# Altium PCB PCB.PcbDoc (part 3 of 8)
Units mm, origin at the board's own origin, x right, y up, seen from the top; angles counter-clockwise.
Board outline 78.8 x 69 mm, 12 copper layers (Top Layer, GND_12, uStrip1, GND_35, Clocks, GND_57, POWER, Slow_Ctrl, GND_810, uStrip2, GND_1012, Bottom Layer), stack 2.926 mm thick; 460 components, 314 nets, 1929 pads, 3409 vias.
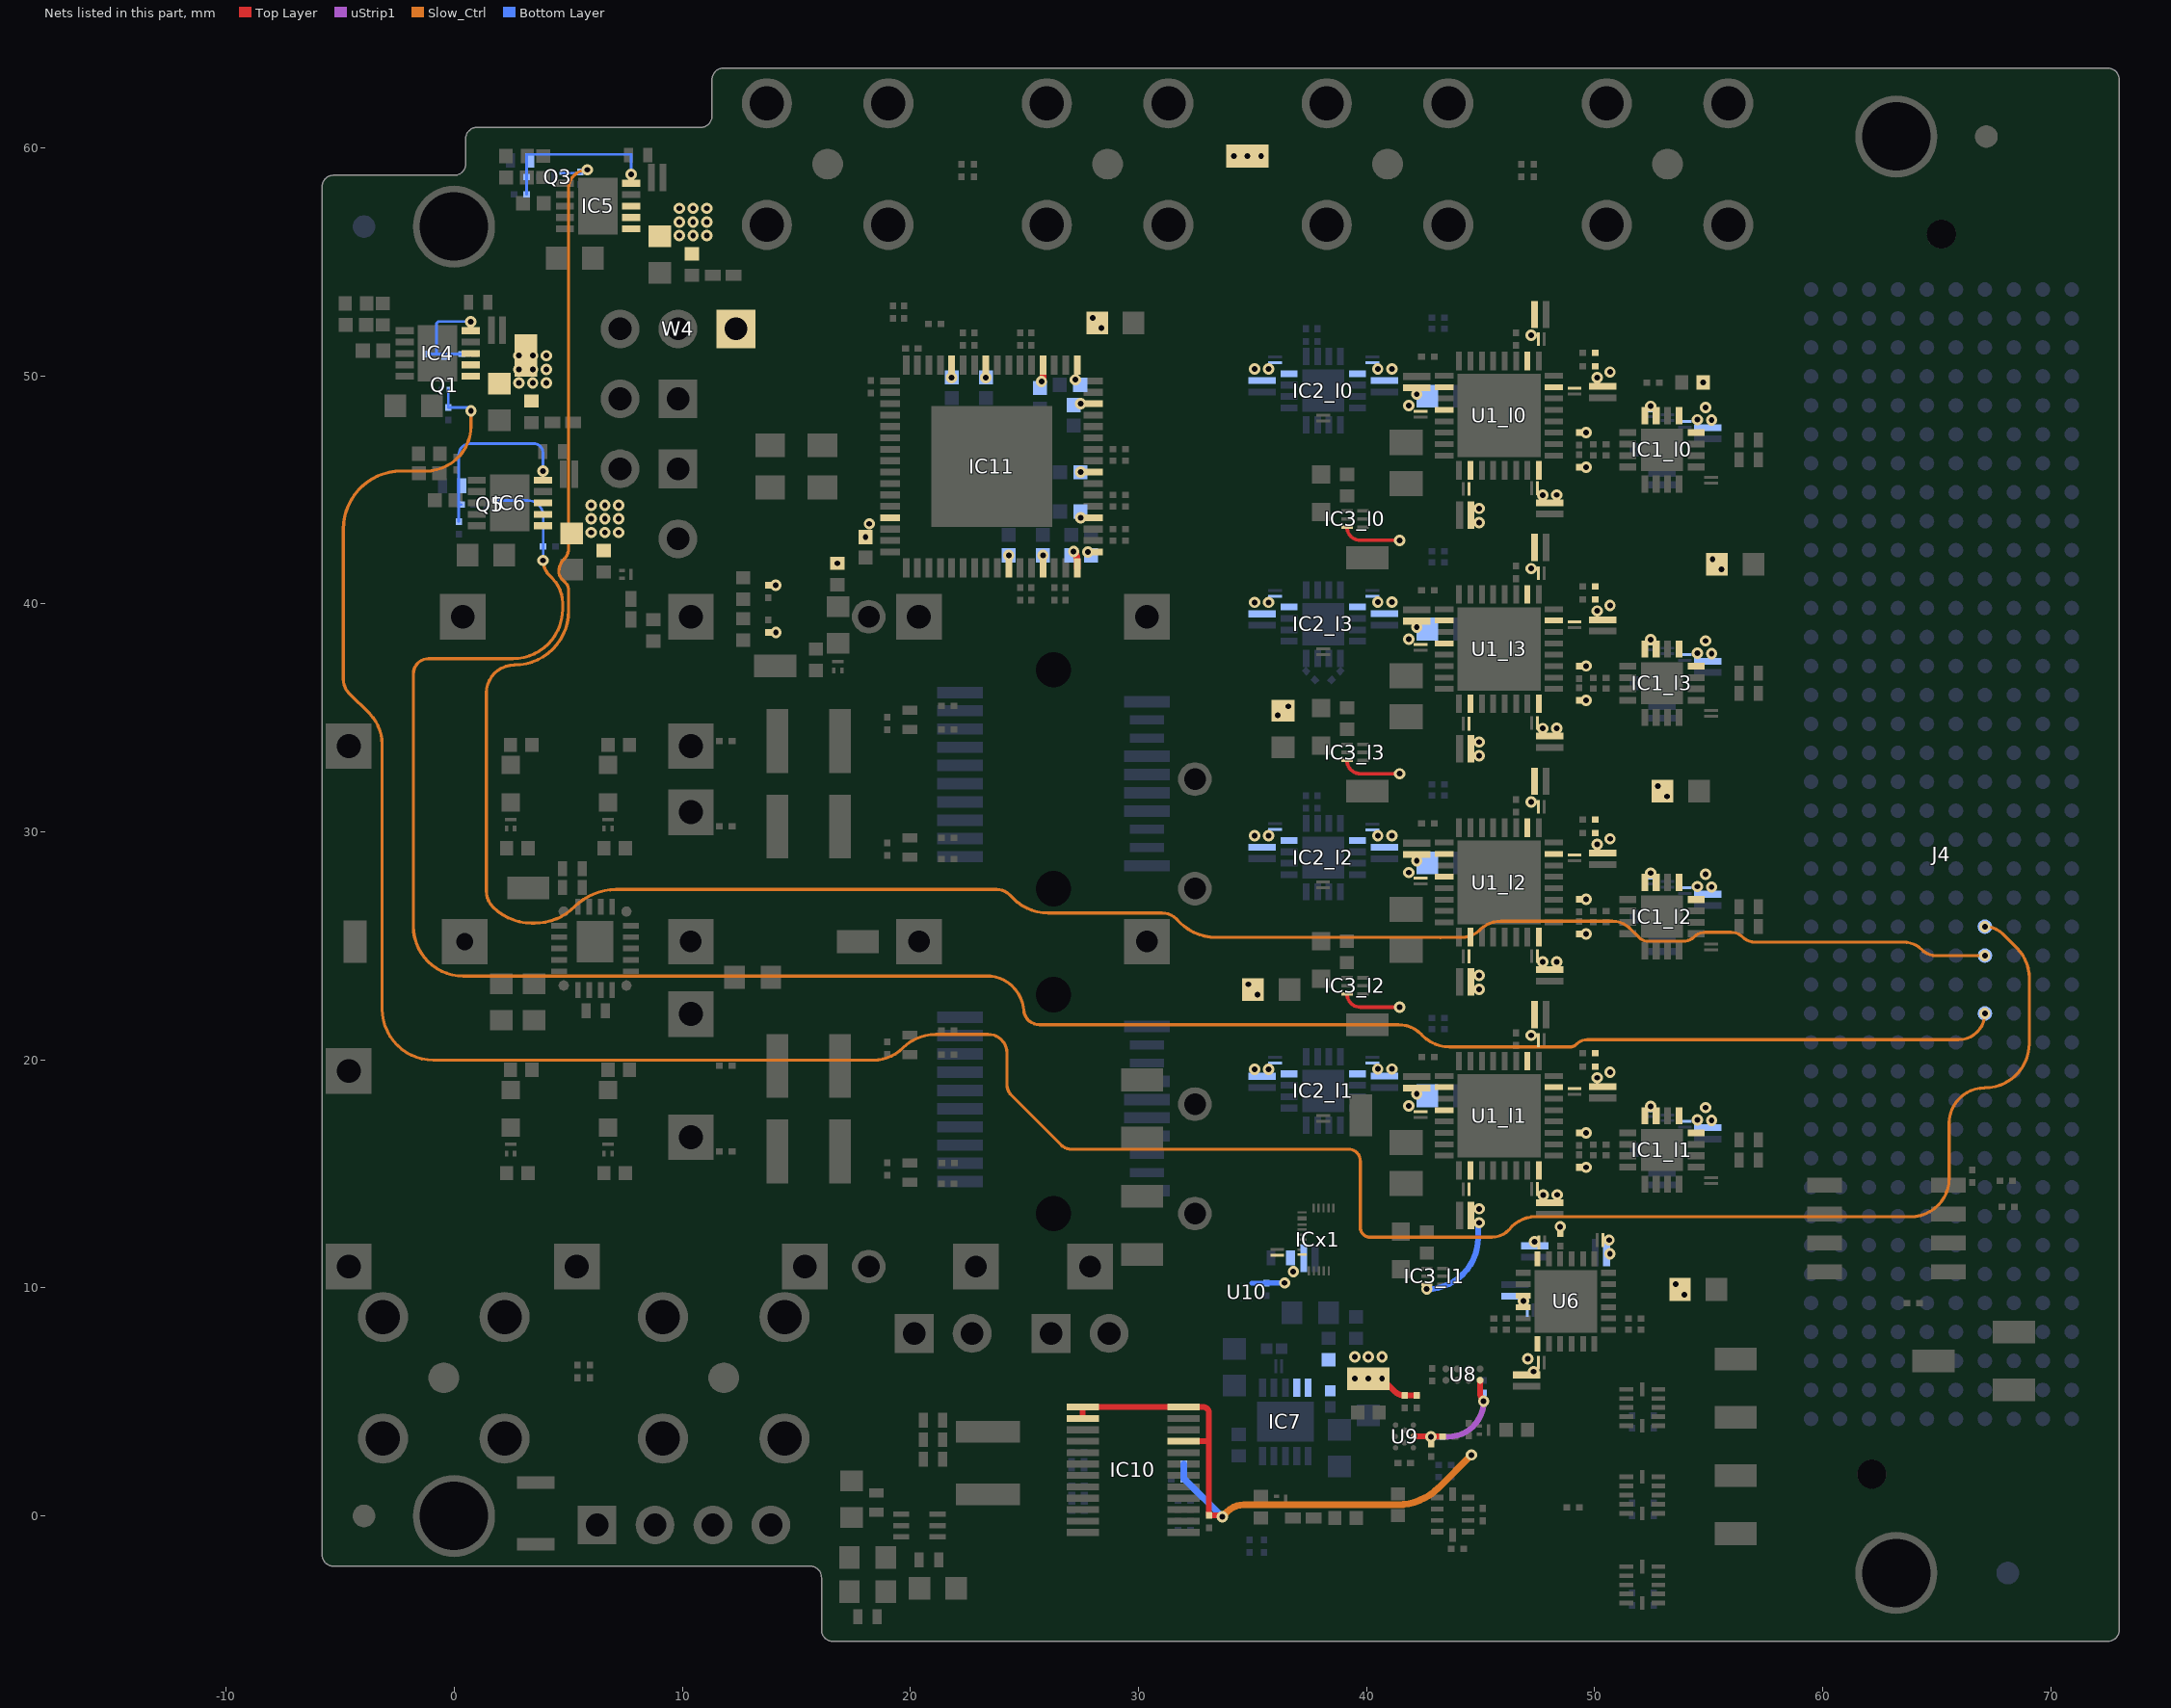
[diagram p12: the nets of this part, all layers, seen from the top]

## Part data (continued)
W1 W2 W5 W6: library part SAMTEC_HTSW-102-23-L-S, "2 Mini Wire-Wrap Contact Strip Header", Manufacturer=SAMTEC, Manufacturer Part Number=HTSW-102-23-L-S, Author="CERN DEM JLC", Component Type=Standard, ComponentHeight=8.38mm, CreateDate=2/22/2018, Family="Header 2", HelpURL=\\cern.ch\dfs\Applications\Altium\Datasheets\SAMTEC_HTSW-102-23-L-S.pdf, LatestRevisionDate=2/22/2018, Mounted=Yes, Part Description="2 Contacts, Pitch 2.54mm, Single Row  Through Mount Straight Header (Post Lead 5.84mm, Tail Lead 2.92mm, Insulator 2.54mm)", Part Number=SAMTEC_HTSW-102-23-L-S, Pin Count=2, PressFit=No, Sense=No, SMD=No, Socket=No, Status=Preferred, Status Comment="High Temperature"
W3: library part SAMTEC_HTSW-104-23-L-S, "4 Mini Wire-Wrap Contact Strip Header", Manufacturer=SAMTEC, Manufacturer Part Number=HTSW-104-23-L-S, Author="CERN DEM JLC", Component Type=Standard, ComponentHeight=8.38mm, CreateDate=2/22/2018, Family="Header 4", HelpURL=\\cern.ch\dfs\Applications\Altium\Datasheets\SAMTEC_HTSW-104-23-L-S.pdf, LatestRevisionDate=2/22/2018, Mounted=Yes, Part Description="4 Contacts, Pitch 2.54mm, Single Row  Through Mount Straight Header (Post Lead 5.84mm, Tail Lead 2.92mm, Insulator 2.54mm)", Part Number=SAMTEC_HTSW-104-23-L-S, Pin Count=4, PressFit=No, Sense=No, SMD=No, Socket=No, Status=Preferred, Status Comment="High Temperature"
W4: library part SAMTEC_HTSW-103-23-L-S, "3 Mini Wire-Wrap Contact Strip Header", Manufacturer=SAMTEC, Manufacturer Part Number=HTSW-103-23-L-S, Author="CERN DEM JLC", Component Type=Standard, ComponentHeight=8.38mm, CreateDate=2/22/2018, Family="Header 3", HelpURL=\\cern.ch\dfs\Applications\Altium\Datasheets\SAMTEC_HTSW-103-23-L-S.pdf, LatestRevisionDate=2/22/2018, Mounted=Yes, Part Description="3 Contacts, Pitch 2.54mm, Single Row Through Mount Straight Header (Post Lead 5.84mm, Tail Lead 2.92mm, Insulator 2.54mm)", Part Number=SAMTEC_HTSW-103-23-L-S, Pin Count=3, PressFit=No, Sense=No, SMD=No, Socket=No, Status=Preferred, Status Comment="High Temperature"
W7: library part SAMTEC_HTSW-101-23-L-S, "Single Mini Wire-Wrap Contact", Manufacturer=SAMTEC, Manufacturer Part Number=HTSW-101-23-L-S, Author="CERN DEM JLC", Component Type=Standard, ComponentHeight=8.38mm, CreateDate=2/22/2018, Family="Header 1", HelpURL=\\cern.ch\dfs\Applications\Altium\Datasheets\SAMTEC_HTSW-101-23-L-S.pdf, LatestRevisionDate=2/22/2018, Mounted=Yes, Part Description="Single Contact Through Mount Straight Header (Post Lead 5.84mm, Tail Lead 2.92mm, Insulator 2.54mm)", Part Number=SAMTEC_HTSW-101-23-L-S, Pin Count=1, PressFit=No, Sense=No, SMD=No, Socket=No, Status=Preferred, Status Comment="High Temperature"

## Free pads (board coordinates)
  round 3.6 hole 3: frame-holes(-0.015,0) frame-holes(-0.015,56.551) frame-holes(63.226,-2.499) frame-holes(63.228,60.499)

## Via types
v1: diameter 0.25, hole 0.1, Top Layer to uStrip1, tented both sides, 1130 vias
v2: diameter 0.25, hole 0.1, uStrip2 to Bottom Layer, tented both sides, 686 vias
v3: diameter 0.5, hole 0.25, Top Layer to Bottom Layer, tented both sides, 674 vias
v4: diameter 0.5, hole 0.25, Top Layer to Bottom Layer, 632 vias
v5: diameter 0.5, hole 0.25, uStrip1 to uStrip2, tented both sides, 281 vias
v6: diameter 0.584, hole 0.483, Top Layer to Bottom Layer, tented both sides, 6 vias

## Nets (pads, with @x,y where several pads share a name; then routed paths per layer and width w, separated by ;. In a path a pad name is that pad's centre, name@x,y a point inside that pad or via, vN(x,y) a via of type N, cw(c..) or ccw(c..) an arc to the next point about the centre after c; other vN are vias at no path point)
1V8: C2_l0.2 C2_l1.2 C2_l2.2 C2_l3.2 C3_l0.2 C3_l1.2 C3_l2.2 C3_l3.2 C4_l0.2 C4_l1.2 C4_l2.2 C4_l3.2 C5_l0.2 C5_l1.2 C5_l2.2 C5_l3.2 C19_l0.2 C19_l1.2 C19_l2.2 C19_l3.2 C20_l0.2 C20_l1.2 C20_l2.2 C20_l3.2 C21_l0.2 C21_l1.2 C21_l2.2 C21_l3.2 C22_l0.2 C22_l1.2 C22_l2.2 C22_l3.2 C57.2 C90.2 C116.2 C117.2 C118.2 C121.2 C122.2 C123.2 C124.2 C125.2 C126.2 C127.2 C128.2 C129.2 C130.2 IC1_l0.12 IC1_l0.13 IC1_l0.15 IC1_l0.16 IC1_l1.12 IC1_l1.13 IC1_l1.15 IC1_l1.16 IC1_l2.12 IC1_l2.13 IC1_l2.15 IC1_l2.16 IC1_l3.12 IC1_l3.13 IC1_l3.15 IC1_l3.16 IC2_l0.8 IC2_l0.13 IC2_l1.8 IC2_l1.13 IC2_l2.8 IC2_l2.13 IC2_l3.8 IC2_l3.13 IC6.1 IC6.2 IC6.3 IC10.1 IC10.2 IC10.21 IC10.24 IC11.26 IC11.29 IC11.32 IC11.33 IC11.36 IC11.40 IC11.46 IC11.49 IC11.52 IC11.57 IC11.60 R24.1 R25.2 R60.2 R61.2 R68.2 R69.2 W4.1 | length 28.7
  Top Layer w0.254: IC10.2@27.554,4.277 IC10.1@27.554,4.777 IC10.24@31.978,4.777 32.835,4.777 cw(c32.835,4.518) 33.093,4.518 33.093,3.277 ; IC10.21@31.978,3.277 33.093,3.277 ; v4(33.671,-0.037) ccw(c33.514,-0.194) 33.514,0.028 C90.2@33.093,0.028 33.093,3.277
  Top Layer w0.3: v3@25.808,49.834 IC11.52@25.808,50.48 ; v3(27.156,42.303) cw(c26.787,41.934) 27.308,41.934 IC11.32@27.308,41.58
  Slow_Ctrl w0.3: v4(33.671,-0.037) 33.92,0.213 cw(c34.597,-0.463) 34.597,0.493 41.358,0.493 ccw(c41.358,3.033) 43.154,1.237 v4(44.595,2.678)
  Bottom Layer w0.3: R61.2@31.978,2.29 R60.2@31.978,1.611 cw(c31.978,1.502) 32.055,1.579 v4(33.671,-0.037)
  other v3: 54.51,17.371 52.449,17.963 35.088,19.595 35.71,19.596 40.49,19.604 41.111,19.603 54.51,27.607 52.449,28.199 35.088,29.832 35.71,29.832 40.49,29.84 41.111,29.839 54.51,37.844 52.449,38.436 14.101,38.748 35.088,40.068 35.71,40.069 40.49,40.076 41.111,40.076 14.099,40.818 24.308,42.13 25.808,42.13 27.78,42.279 27.458,43.78 27.458,45.78 54.51,48.08 52.449,48.672 27.458,48.78 54.758,49.712 25.745,49.756 27.232,49.834 21.808,49.93 23.308,49.93 35.088,50.305 35.71,50.305 40.49,50.313 41.111,50.312
  other v4: 53.94,9.707 53.547,10.165 55.128,17.352 54.868,17.91 35.21,22.862 34.818,23.321 55.128,27.588 54.868,28.146 53.164,31.557 52.772,32.015 36.109,35.115 36.567,35.507 55.128,37.824 54.868,38.382 55.563,41.512 55.17,41.97 6.002,43.133 6.602,43.133 7.202,43.133 6.002,43.733 6.602,43.733 7.202,43.733 6.002,44.333 6.602,44.333 7.202,44.333 55.128,48.061 54.868,48.619 28.379,52.096 27.987,52.554
1V8_DIS: J4.D26 Q5.1 R40.2 | length 98.4
  Slow_Ctrl w0.137: v3(3.896,41.908) ccw(c4.819,41.908) 4.166,41.254 4.301,41.12 cw(c3.216,40.034) 4.75,40.034 4.75,39.782 cw(c2.568,39.782) 2.568,37.6 -1.131,37.6 ccw(c-1.131,36.936) -1.794,36.936 -1.794,25.864 ccw(c0.392,25.864) 0.392,23.677 23.489,23.677 cw(c23.489,23.54) 23.5,23.677 cw(c23.353,22.069) 24.949,22.311 24.967,22.198 ccw(c25.647,22.23) 25.647,21.549 41.392,21.549 cw(c41.392,20.151) 42.381,21.14 42.461,21.059 ccw(c43.635,22.233) 43.635,20.573 48.919,20.573 ccw(c48.919,20.981) 49.208,20.692 cw(c49.678,20.222) 49.678,20.887 65.954,20.887 ccw(c65.954,22.04) v3(67.108,22.04)
  Bottom Layer w0.117: Q5.1@1.754,44.539 3.22,44.539 cw(c3.22,43.863) 3.896,43.863 R40.2@3.896,42.519 v3(3.896,41.908)
1V8_EN: C68.1 IC6.5 R36.1 R37.2 | length 8.1
  Bottom Layer w0.117: R36.1@0.197,43.604 R37.2@0.197,44.364 ; R37.2@0.307,44.364 R37.2@0.197,44.364 ; v3(3.884,45.827) 3.884,46.643 ccw(c3.494,46.643) 3.494,47.033 0.693,47.033 ccw(c0.693,46.536) 0.197,46.536 R37.2@0.197,44.364
1VPSF: C64.2 C65.2 C131.2 C132.2 C133.2 C145.1 C149.1 C151.2 IC7.9 IC7.10 ICx1.19 R34.2 R79.2 R81.1 R82.1 TP7.1 U8.8 U9.2 U10.5 | length 8.7
  Top Layer w0.254: TP7.1@40.674,6.022 41.233,5.463 ccw(c41.661,5.892) R81.1@41.661,5.286 R82.1@42.209,5.286 ; U9.2@42.063,3.49 v3@42.817,3.49 ; v3(42.827,3.475) 42.827,3.49 R79.2@43.322,3.49 ; U8.8@44.975,5.953 44.975,5.417 ccw(c45.513,5.417) v3(45.132,5.037)
  uStrip1 w0.254: v3(42.827,3.475) 43.57,3.475 ccw(c43.57,5.037) v3(45.132,5.037)
  Bottom Layer w0.127: U10.5@34.977,10.211 U10.5@34.977,10.214
  Bottom Layer w0.229: U10.5@34.977,10.211 C151.2@35.616,10.211 ; C151.2@35.603,10.221 v3(36.408,10.221)
  Bottom Layer w0.254: v3(45.132,5.037) v3@45.141,5.037
  other v3: 36.788,10.723
  other v4: 39.477,6.022 40.077,6.022 40.677,6.022 39.477,6.978 40.077,6.978 40.677,6.978
3V3_APLL_DIS: J4.D23 Q1.1 R10.2 | length 124.4
  Slow_Ctrl w0.137: v3(0.73,48.464) 0.73,47.812 cw(c-1.254,47.812) -1.254,45.828 -2.325,45.828 ccw(c-2.325,43.288) -4.865,43.288 -4.865,36.698 ccw(c-3.987,36.698) -4.608,36.078 -3.714,35.184 cw(c-5.047,33.851) -3.162,33.851 -3.162,22.233 ccw(c-0.923,22.233) -0.923,19.994 18.378,19.994 ccw(c18.378,21.82) 19.669,20.529 cw(c21.11,19.087) 21.11,21.126 23.408,21.126 cw(c23.408,20.299) 24.235,20.299 24.235,19.176 24.235,18.907 ; 24.235,18.906 ccw(c24.883,18.907) 24.425,18.449 26.6,16.274 ccw(c27.055,16.73) 27.055,16.086 39.209,16.086 cw(c39.209,15.57) 39.725,15.57 39.725,12.654 ccw(c40.151,12.654) 40.151,12.227 45.49,12.227 ccw(c45.49,13.285) 46.238,12.537 cw(c47.398,11.683) 47.398,13.124 63.857,13.124 ccw(c63.857,14.809) 65.543,14.809 65.543,17.221 cw(c67.096,17.221) 67.096,18.774 ccw(c67.096,20.733) 69.055,20.733 69.055,23.612 ccw(c67.226,23.612) 68.519,24.905 67.905,25.52 ccw(c67.108,24.723) v3(67.108,25.85)
  Bottom Layer w0.117: Q1.1@-0.263,49.404 R10.2@-0.263,48.618 0.576,48.618 cw(c0.576,48.464) v3(0.73,48.464)
3V3_CDR_DIS: J4.D24 Q3.1 R32.2 | length 103.5
  Slow_Ctrl w0.137: v3(5.834,59.04) ccw(c5.834,58.218) 5.012,58.218 5.012,42.442 cw(c4.346,42.442) 4.817,41.97 4.806,41.959 ccw(c5.34,41.425) 4.585,41.425 ccw(c5.073,41.425) 4.728,41.08 4.879,40.928 cw(c4.558,40.607) 5.012,40.607 5.012,39.699 cw(c2.634,39.699) 2.634,37.321 ccw(c2.634,36.089) 1.403,36.089 1.403,27.415 ccw(c2.408,27.415) 1.697,26.704 ccw(c3.395,28.402) 3.395,26 3.521,26 ccw(c3.521,28.5) 5.289,26.733 cw(c7.085,24.936) 7.085,27.476 23.79,27.476 cw(c23.79,26.699) 24.34,27.249 24.512,27.077 ccw(c26.031,28.596) 26.031,26.448 31.033,26.448 cw(c31.033,25.568) 31.655,26.19 31.815,26.03 ccw(c33.4,27.615) 33.4,25.374 43.222,25.374 cw(c43.222,25.237) 43.227,25.374 ccw(c43.247,25.793) 43.248,25.373 44.156,25.374 ccw(c44.156,26.551) 44.988,25.718 cw(c45.886,24.821) 45.886,26.09 50.785,26.09 cw(c50.785,25.033) 51.533,25.781 51.931,25.383 ccw(c52.358,25.81) 52.358,25.205 53.891,25.205 ccw(c53.891,25.862) 54.356,25.398 cw(c54.852,24.901) 54.852,25.604 55.974,25.604 cw(c55.974,24.875) 56.489,25.39 ccw(c57.015,25.916) 57.015,25.172 63.531,25.172 cw(c63.531,24.022) 63.841,25.13 cw(c63.531,24.022) 64.344,24.835 ccw(c64.961,25.452) 64.961,24.58 v3(67.108,24.58)
  Bottom Layer w0.117: Q3.1@4.731,58.898 R32.2@5.517,58.898
3V3APLL: C35.2 C115.2 IC4.1 IC4.2 IC4.3 IC11.13 R9.2 R72.2 TP2.1
  other v3: 16.799,41.782 18.033,42.93 18.198,43.515
  other v4: 2.836,49.69 3.436,49.69 4.036,49.69 2.836,50.29 3.436,50.29 4.036,50.29 2.836,50.89 3.436,50.89 4.036,50.89
3V3APLL_EN: C33.2 IC4.5 R7.1 R8.2 | length 4.4
  Bottom Layer w0.117: -1.061,50.961 -0.779,50.961 ; R8.2@-0.438,50.851 R8.2@-0.548,50.961 ; C33.2@0.327,50.961 -0.438,50.961 R8.2@-0.548,50.961 ; v3(0.718,52.383) -0.704,52.383 -0.779,52.309 -0.779,50.961 ; -0.779,50.961 R8.2@-0.548,50.961
3V3CDR: C6_l0.2 C6_l1.2 C6_l2.2 C6_l3.2 C7_l0.2 C7_l1.2 C7_l2.2 C7_l3.2 C8_l0.2 C8_l1.2 C8_l2.2 C8_l3.2 C9_l0.2 C9_l1.2 C9_l2.2 C9_l3.2 C10_l0.2 C10_l1.2 C10_l2.2 C10_l3.2 C14_l0.2 C14_l1.2 C14_l2.2 C14_l3.2 C15_l0.2 C15_l1.2 C15_l2.2 C15_l3.2 C16_l0.2 C16_l1.2 C16_l2.2 C16_l3.2 C17_l0.2 C17_l1.2 C17_l2.2 C17_l3.2 C26_l0.2 C26_l1.2 C26_l2.2 C26_l3.2 C27_l0.2 C27_l1.2 C27_l2.2 C27_l3.2 C47.2 C134.2 C135.2 C136.2 C137.2 C138.2 C139.2 C143.1 C144.1 IC3_l0.6 IC3_l1.6 IC3_l2.6 IC3_l3.6 IC5.1 IC5.2 IC5.3 R1_l0.2 R1_l1.2 R1_l2.2 R1_l3.2 R2_l0.2 R2_l1.2 R2_l2.2 R2_l3.2 R3_l0.2 R3_l1.2 R3_l2.2 R3_l3.2 R4_l0.2 R4_l1.2 R4_l2.2 R4_l3.2 R14.2 R76.1 TP4.1 U1_l0.2 U1_l0.10 U1_l0.12 U1_l0.18 U1_l0.24 U1_l0.31 U1_l1.2 U1_l1.10 U1_l1.12 U1_l1.18 U1_l1.24 U1_l1.31 U1_l2.2 U1_l2.10 U1_l2.12 U1_l2.18 U1_l2.24 U1_l2.31 U1_l3.2 U1_l3.10 U1_l3.12 U1_l3.18 U1_l3.24 U1_l3.31 U6.12 U6.15 U6.16 U6.19 | length 12.2
  Top Layer w0.152: IC3_l2.6@39.14,22.903 ccw(c39.727,22.903) 39.727,22.316 v3(41.449,22.316) ; IC3_l3.6@39.14,33.14 ccw(c39.727,33.14) 39.727,32.553 v3(41.449,32.553) ; IC3_l0.6@39.14,43.376 ccw(c39.727,43.376) 39.727,42.789 v3(41.449,42.789)
  Bottom Layer w0.254: v3(42.64,9.952) ccw(c42.64,12.199) 44.887,12.199 v3@44.887,12.965
  other v3: 47.324,6.335 47.062,6.893 46.873,9.427 50.671,11.503 47.37,12.024 50.631,12.103 48.492,12.69 44.937,12.864 44.937,13.473 47.741,14.08 48.362,14.087 49.627,15.293 49.627,16.807 41.845,17.984 42.198,18.515 50.106,19.221 50.673,19.462 47.211,21.08 44.937,23.1 44.937,23.709 47.717,24.296 48.339,24.303 49.627,25.529 49.627,27.044 41.845,28.221 42.198,28.736 50.106,29.458 50.673,29.698 47.211,31.316 44.937,33.336 44.937,33.946 47.717,34.539 48.339,34.546 49.627,35.766 49.627,37.28 41.845,38.457 42.198,38.987 50.106,39.694 50.673,39.934 47.211,41.553 44.937,43.573 44.937,44.187 47.717,44.777 48.339,44.784 49.627,46.002 49.627,47.516 41.845,48.695 42.198,49.196 50.106,49.931 50.673,50.172 47.211,51.789
  other v4: 9.869,56.152 10.469,56.152 11.069,56.152 9.869,56.752 10.469,56.752 11.069,56.752 9.869,57.352 10.469,57.352 11.069,57.352 34.176,59.64 34.776,59.64 35.376,59.64
3V3CDR_EN: C63.1 IC5.5 R28.1 R29.2 | length 7.2
  Bottom Layer w0.117: R28.1@3.174,57.963 R29.2@3.174,58.723 3.174,59.713 7.751,59.713 v3(7.751,58.845)